# Altium PCB Boost_Converter.PcbDoc
Units mil, origin at the board's own origin, x right, y up, seen from the top; angles counter-clockwise.
Board outline 6000 x 4000 mil, 2 copper layers (Top Layer, Bottom Layer); 8 components, 5 nets, 21 pads, 6 vias.
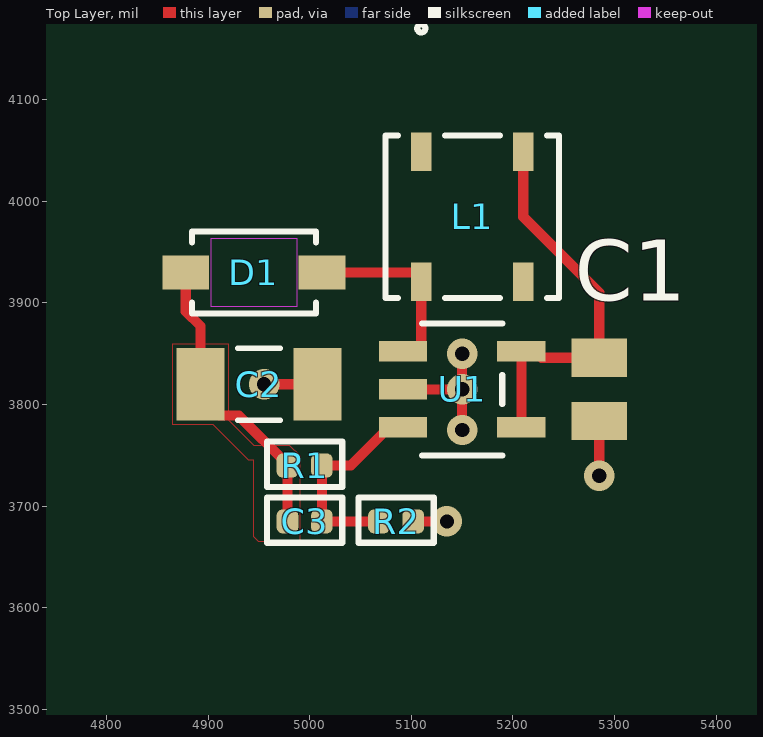
[diagram p0: Top Layer view]
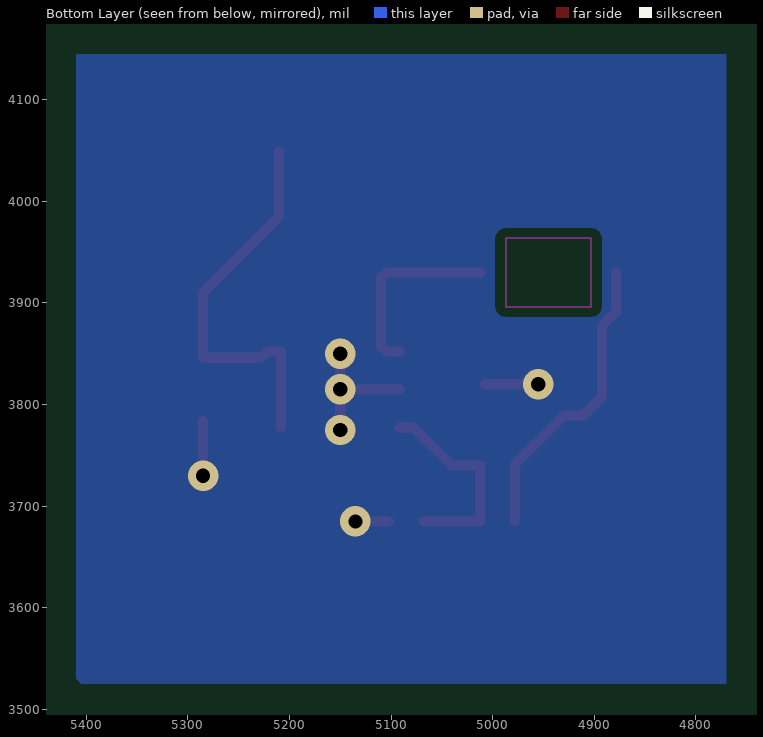
[diagram p1: Bottom Layer view, seen from below]
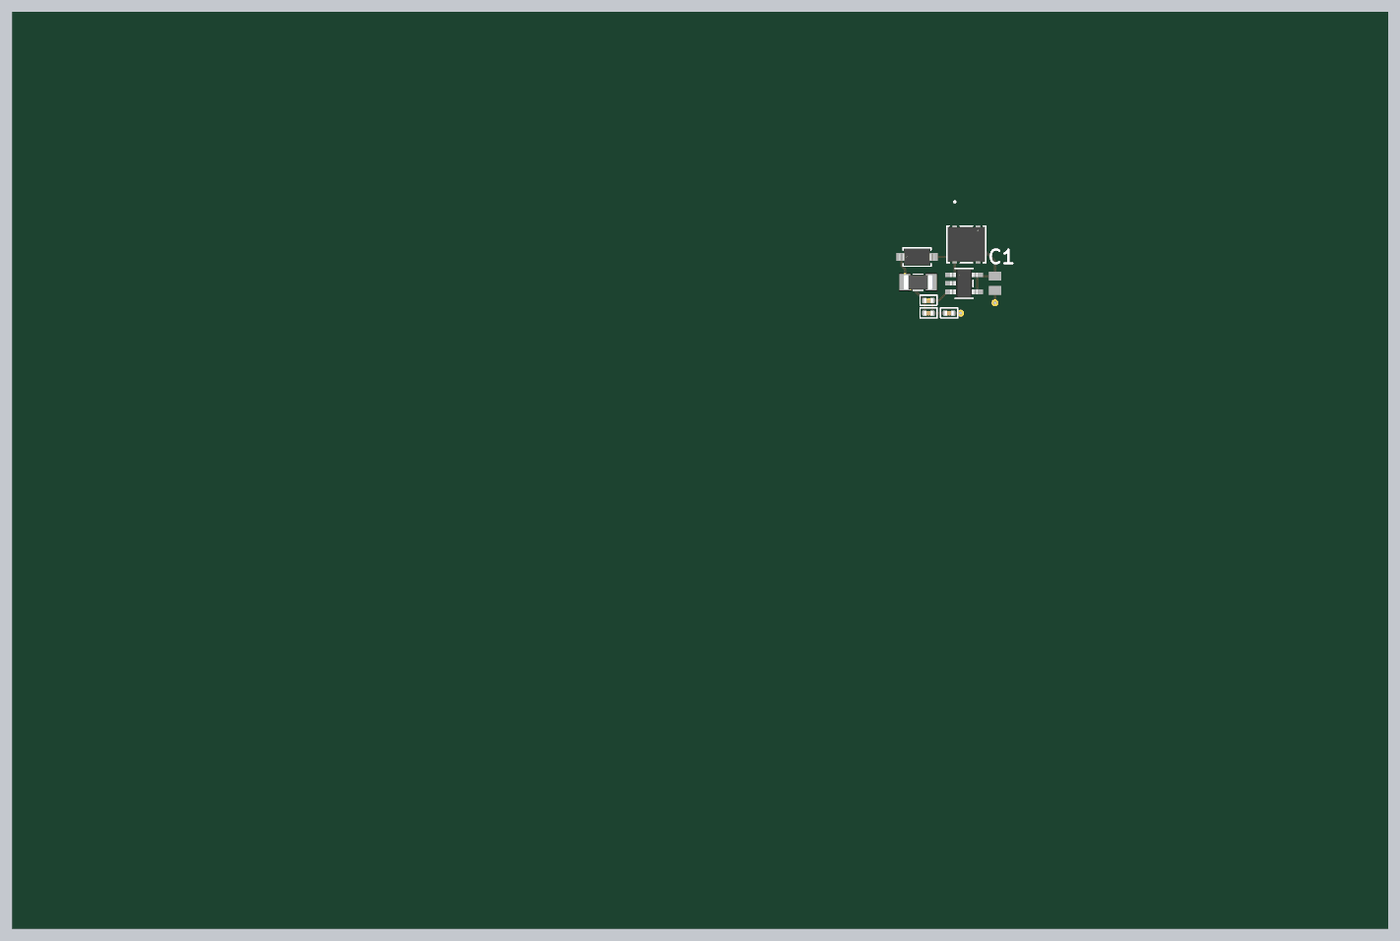
[diagram p2: 3D render of the assembled board from above, using the file's embedded part models]

## Layer stack, top to bottom
Top Solder: solder mask 0.4, Solder Resist, Dk 3.5
Top Layer: signal copper 1.4
Dielectric 1: dielectric 12.6, FR-4, Dk 4.8
Bottom Layer: signal copper 1.4
Bottom Solder: solder mask 0.4, Solder Resist, Dk 3.5

## Board outline
1000,1000 7000,1000 7000,5000 1000,5000

## Design rules (kind name [scope] priority, off if disabled: settings)
Clearance [All] p1: gap=10 ignorepadtopadclearanceinfootprint=FALSE
PolygonConnect [All] p1: connectstyle=Relief reliefconductorwidth=10 reliefentries=4 polygonreliefangle="90 Angle" airgapwidth=10
RoutingVias [All] p1: holewidth=28 width=50 viastyle="Through Hole" minholewidth=28 minwidth=50 maxholewidth=28 maxwidth=50
SolderMaskExpansion [All] p1: expansion=0 istentingtop=FALSE
SupplyNets "Schematic Supply Nets_2" [InNet('+5V')] p1: voltage=0.000
SupplyNets "Schematic Supply Nets_1" [InNet('+18V')] p2: voltage=0.000
SupplyNets "Schematic Supply Nets" [InNet('GND')] p3: voltage=0.000
Width [All] p1: maxlimit=10 minlimit=10 preferedwidth=10
30 further rules are at their usual default settings.

## Classes and differential pairs
component class Boost_Converter: C1 C2 C3 D1 R1 R2 U1

## Components (designator, comment, footprint, x,y, rotation, side; value= is the part's Value field where it differs from the comment)
C1 "JMK212BJ475MG-T" CAPC2012X135N 5285,3815 r270 top
C2 "GMK316BJ105KL-T" CAPC3216X180N 4950,3820 r0 top
C3 "22pF, 50V" CL05A105KL5NRNC 4995,3685 r180 top value=10µF
D1 "MBR0530-TP" SOD-123_MCC 4945,3930 r0 top
L1 "CR32NP-100KC" SMD4_CR32NP_SUM-L 5160,3985 r270 top
R1 "2.2M" CL05A105KL5NRNC 4995,3740 r180 top value=5.11kΩ
R2 "160K" CL05A105KL5NRNC 5085,3685 r180 top value=5.11kΩ
U1 "TPS61040DDCT" DDC5-M 5150,3815 r0 top

## Footprints (in the part's own frame and the unit in brackets; to place one, negate y for a bottom-side part, rotate by r counter-clockwise, add the part's x,y. Pads: shape width x height; smd on the part's side, far side on the other; paste and mask are expansions set on the pad)
CAPC2012X135N [mm] "6.3V 4.7uF X5R 20% 0805"
  rect 0.96x1.39 smd: 1(-0.79,0) 2(0.79,0)
CAPC3216X180N [mm]
  rect 1.2x1.82 smd paste+0 mask+0.102: 1(-1.46,0) 2(1.46,0)
  silkscreen extent -0.54,-0.9 0.54,0.9, body extent -1.6,-0.8 1.6,0.8, height 1.25
CL05A105KL5NRNC [mm]
  rrect53% 0.54x0.6 smd: 1(-0.43,0) 2(0.43,0)
  silkscreen extent -0.94,-0.6 0.94,0.53, body extent -0.5,-0.25 0.5,0.25, height 0.55
DDC5-M [mil]
  rect 47.5x20 smd paste+0 mask+0: 1(-58.25,37.4) 2(-58.25,0) 3(-58.25,-37.4) 4(58.25,-37.4) 5(58.25,37.4)
  silkscreen extent -40,-65 40,65, body extent -60,-60 60,60, height 43
SMD4_CR32NP_SUM-L [mm]
  rect 0.962x0.509 smd paste+0 mask+0: 1(-1.624,-1.275) 2(-1.624,1.275) 3(1.624,1.275) 4(1.624,-1.275)
  silkscreen extent -4.81,-2.17 2.03,2.17, body extent -1.91,-2.04 1.91,2.04, height 3
SOD-123_MCC [mil]
  rect 46x33 smd paste+0 mask+0: 1(-67,0) 2(67,0)
  Keep-Out Layer region: -42,-33.5 -42,33.5 42,33.5 42,-33.5
  silkscreen extent -61,-40 61,40, body extent -76,-36 76,36, height 53

## Part data
C1: "TAIYO YUDEN - JMK212BJ475MG-T - CERAMIC CAPACITOR 4.7UF, 6.3V, X5R, 20%, 0805", Manufacturer_Name="TAIYO YUDEN", Mouser Part Number=963-JMK212BJ475MG-T, Datasheet Link=http://www.mouser.com/datasheet/2/396/mlcc02_e-1307760.pdf, Geometry.Height=1.35mm, Manufacturer_Part_Number=JMK212BJ475MG-T, Mouser Price/Stock=https://www.mouser.co.uk/ProductDetail/Taiyo-Yuden/JMK212BJ475MG-T?qs=I6KAKw0tg2zktZTXqiY4IQ%3D%3D
C2: "Multilayer Ceramic Capacitor; 1206 35V X7R 1uF +-10% Paper T&R", Package="SMD-2 TAIYO", Check_prices=https://www.snapeda.com/parts/GMK316BJ105KL-T/Taiyo+Yuden/view-part/?ref=eda, MF="Taiyo Yuden", MP=GMK316BJ105KL-T, SnapEDA_Link=https://www.snapeda.com/parts/GMK316BJ105KL-T/Taiyo+Yuden/view-part/?ref=snap
C3: library part CC0402JRNPO9BN220, "CAP CER 22PF 50V C0G/NPO 0402", Case Code (Imperial)=0402, Case Code (Metric)=1005, Dielectric Material=Ceramic, LCSC Part NO=C307415, Manufacturer="Samsung Electro-Mechanics", Manufacturer Part Number=CL05A106MP8NUB8, Max Operating Temperature=85°C, Min Operating Temperature=-55°C, Tolerance=20%, Voltage Rating=10V, Case/Package=0402, Category="Ceramic Capacitors", China RoHS=Compliant, ComponentLink1Description=https://datasheet.octopart.com:443/CL05A106MP8NUB8-Samsung-Electro-Mechanics-datasheet-136460857.pdf?src-supplier=IHS, ComponentLink1URL=https://datasheet.octopart.com:443/CL05A106MP8NUB8-Samsung-Electro-Mechanics-datasheet-136460857.pdf?src-supplier=IHS, ComponentLink2Description=https://datasheet.octopart.com:443/CL05A106MP8NUB8-Samsung-Electro-Mechanics-datasheet-181551178.pdf?src-supplier=Newark, ComponentLink2URL=https://datasheet.octopart.com:443/CL05A106MP8NUB8-Samsung-Electro-Mechanics-datasheet-181551178.pdf?src-supplier=Newark, ComponentLink3Description=https://datasheet.octopart.com:443/CL05A106MP8NUB8-Samsung-Electro-Mechanics-datasheet-136031724.pdf?src-supplier=Newark, ComponentLink3URL=https://datasheet.octopart.com:443/CL05A106MP8NUB8-Samsung-Electro-Mechanics-datasheet-136031724.pdf?src-supplier=Newark, ComponentLink4Description=https://datasheet.octopart.com:443/CL05A106MP8NUB8-Samsung-Electro-Mechanics-datasheet-141346815.pdf?src-supplier=Samsung+SCT, ComponentLink4URL=https://datasheet.octopart.com:443/CL05A106MP8NUB8-Samsung-Electro-Mechanics-datasheet-141346815.pdf?src-supplier=Samsung+SCT, ComponentLink5Description=https://datasheet.octopart.com:443/CL05A106MP8NUB8-Samsung-Electro-Mechanics-datasheet-110326781.pdf?src-supplier=Future+Electronics, ComponentLink5URL=https://datasheet.octopart.com:443/CL05A106MP8NUB8-Samsung-Electro-Mechanics-datasheet-110326781.pdf?src-supplier=Future+Electronics, ComponentLink6Description=https://datasheet.octopart.com:443/CL05A106MP8NUB8-Samsung-Electro-Mechanics-datasheet-96443587.pdf?src-supplier=Future+Electronics, ComponentLink6URL=https://datasheet.octopart.com:443/CL05A106MP8NUB8-Samsung-Electro-Mechanics-datasheet-96443587.pdf?src-supplier=Future+Electronics, ComponentLink7Description=https://datasheet.octopart.com:443/CL05A106MP8NUB8-Samsung-Electro-Mechanics-datasheet-68297032.pdf?src-supplier=Future+Electronics, ComponentLink7URL=https://datasheet.octopart.com:443/CL05A106MP8NUB8-Samsung-Electro-Mechanics-datasheet-68297032.pdf?src-supplier=Future+Electronics, ComponentLink8Description=https://datasheet.octopart.com:443/CL05A106MP8NUB8-Samsung-Electro-Mechanics-datasheet-86032222.pdf?src-supplier=Future+Electronics, ComponentLink8URL=https://datasheet.octopart.com:443/CL05A106MP8NUB8-Samsung-Electro-Mechanics-datasheet-86032222.pdf?src-supplier=Future+Electronics, Country of Origin="Mainland China, Philippines, South Korea", Export Control Classification Number (ECCN) Code=EAR99, Harmonized Tariff Schedule (HTS) Code=8532.24.00.20, Height=800µm, Introduction Date=2014-02-27, Length=1mm, Lifecycle Status=Production, Material=Ceramic, Mounting Technology="Surface Mount", Number of Terminals=2, Pricing="10=0.219, 25=0.191, 50=0.163, 100=0.145, 250=0.131, 500=0.116, 1000=0.107 (USD)", REACH SVHC=Yes, RoHS=Compliant, Schedule B="8532240020, 8532240020|8532240020, 8532240020|8532240020|8532240020, 8532240020|8532240020|8532240020|8532240020", Stock=25769, Supplier=Newark, Supplier Part Number=CL05A106MP8NUB8, Thickness=889µm, Voltage Rating (DC)=10V, Width=500µm
D1: "DIODE SCHOTTKY 30V 500MA SOD123", Manufacturer_Name=MCC, Copyright="Copyright (C) 2025 Ultra Librarian. All rights reserved.", Manufacturer_Part_Number=MBR0530-TP
L1: "FIXED IND 10UH 760MA 230 MOHM", Manufacturer_Name=Sumida, Copyright="Copyright (C) 2025 Ultra Librarian. All rights reserved.", Manufacturer_Part_Number=CR32NP-100KC, RefDes=RefDes, Type="Fixed Inductors"
R1: library part RC0402FR-132M2L, "RES 2.2M OHM 1% 1/16W 0402", Case/Package=0402, LCSC Part number=C227153, Manufacturer="Yageo Group", Manufacturer Part Number=AC0402FR-075K11L, Max Operating Temperature=155°C, Max Power Dissipation=63mW, Min Operating Temperature=-55°C, Power Rating=62.5mW, Ratings=AEC-Q200, Temperature Coefficient=100ppm/°C, Tolerance=1%, Voltage Rating=50V, Category="Chip SMD Resistors", China RoHS=Non-Compliant, ComponentLink1Description=https://datasheet.octopart.com:443/AC0402FR-075K11L-Yageo-datasheet-182189377.pdf?src-supplier=IHS, ComponentLink1URL=https://datasheet.octopart.com:443/AC0402FR-075K11L-Yageo-datasheet-182189377.pdf?src-supplier=IHS, ComponentLink2Description=https://datasheet.octopart.com:443/AC0402FR-075K11L-Yageo-datasheet-83209224.pdf?src-supplier=Upverter, ComponentLink2URL=https://datasheet.octopart.com:443/AC0402FR-075K11L-Yageo-datasheet-83209224.pdf?src-supplier=Upverter, ComponentLink3Description=https://datasheet.octopart.com:443/AC0402FR-075K11L-Yageo-datasheet-178509465.pdf?src-supplier=Farnell, ComponentLink3URL=https://datasheet.octopart.com:443/AC0402FR-075K11L-Yageo-datasheet-178509465.pdf?src-supplier=Farnell, ComponentLink4Description=https://datasheet.octopart.com:443/AC0402FR-075K11L-Yageo-Group-datasheet-193561632.pdf?src-supplier=element14+APAC, ComponentLink4URL=https://datasheet.octopart.com:443/AC0402FR-075K11L-Yageo-Group-datasheet-193561632.pdf?src-supplier=element14+APAC, ComponentLink5Description=https://datasheet.octopart.com:443/AC0402FR-075K11L-Yageo-Group-datasheet-189830439.pdf?src-supplier=Future+Electronics, ComponentLink5URL=https://datasheet.octopart.com:443/AC0402FR-075K11L-Yageo-Group-datasheet-189830439.pdf?src-supplier=Future+Electronics, ComponentLink6Description=https://datasheet.octopart.com:443/AC0402FR-075K11L-Yageo-datasheet-166720450.pdf?src-supplier=Future+Electronics, ComponentLink6URL=https://datasheet.octopart.com:443/AC0402FR-075K11L-Yageo-datasheet-166720450.pdf?src-supplier=Future+Electronics, ComponentLink7Description=https://datasheet.octopart.com:443/AC0402FR-075K11L-Yageo-datasheet-151884373.pdf?src-supplier=Future+Electronics, ComponentLink7URL=https://datasheet.octopart.com:443/AC0402FR-075K11L-Yageo-datasheet-151884373.pdf?src-supplier=Future+Electronics, ComponentLink8Description=https://datasheet.octopart.com:443/AC0402FR-075K11L-Yageo-datasheet-137699919.pdf?src-supplier=Future+Electronics, ComponentLink8URL=https://datasheet.octopart.com:443/AC0402FR-075K11L-Yageo-datasheet-137699919.pdf?src-supplier=Future+Electronics, ComponentLink9Description=https://datasheet.octopart.com:443/AC0402FR-075K11L-Yageo-Group-datasheet-188689268.pdf?src-supplier=LCSC, ComponentLink9URL=https://datasheet.octopart.com:443/AC0402FR-075K11L-Yageo-Group-datasheet-188689268.pdf?src-supplier=LCSC, ComponentLink10Description=https://datasheet.octopart.com:443/AC0402FR-075K11L-Yageo-datasheet-128678413.pdf?src-supplier=X-ON, ComponentLink10URL=https://datasheet.octopart.com:443/AC0402FR-075K11L-Yageo-datasheet-128678413.pdf?src-supplier=X-ON, ComponentLink11Description=https://datasheet.octopart.com/AC0402FR-075K11L-Yageo-datasheet-12512238.pdf, ComponentLink11URL=https://datasheet.octopart.com/AC0402FR-075K11L-Yageo-datasheet-12512238.pdf, ComponentLink12Description=http://sigma.octopart.com:80/conflict_mineral_statement/Yageo-company-3.pdf?src-supplier=Compliance+Statements, ComponentLink12URL=http://sigma.octopart.com:80/conflict_mineral_statement/Yageo-company-3.pdf?src-supplier=Compliance+Statements, ComponentLink13Description=http://sigma.octopart.com:80/rohs_statement/Yageo-company-2.pdf?src-supplier=Compliance+Statements, ComponentLink13URL=http://sigma.octopart.com:80/rohs_statement/Yageo-company-2.pdf?src-supplier=Compliance+Statements, Composition="Thick Film", Country of Origin="Mainland China, Taiwan", Export Control Classification Number (ECCN) Code=EAR99, Features="Automotive AEC-Q200, Moisture Resistant", Harmonized Tariff Schedule (HTS) Code=8533.21.00.30, Height=320µm, Introduction Date=2012-04-10, Length=1mm, Lifecycle Status=Production, Mounting Technology="Surface Mount", Number of Terminals=2, Number of Terminations=2, Packaging="Tape & Reel", Pricing="10000=0.0017, 30000=0.0016 (USD)", REACH SVHC=Yes, RoHS=Compliant, Schedule B="8533210045, 8533210045|8533210045|8533210045|8533210045|8533210045", Stock=320000, Supplier="Arrow Electronics", Supplier Part Number=AC0402FR-075K11L, Width=500µm, Working Voltage=50V
R2: library part CPF0402B160KE1, "RES SMD 160K OHM 0.1% 1/16W 0402", Case/Package=0402, LCSC Part number=C227153, Manufacturer="Yageo Group", Manufacturer Part Number=AC0402FR-075K11L, Max Operating Temperature=155°C, Max Power Dissipation=63mW, Min Operating Temperature=-55°C, Power Rating=62.5mW, Ratings=AEC-Q200, Temperature Coefficient=100ppm/°C, Tolerance=1%, Voltage Rating=50V, Category="Chip SMD Resistors", China RoHS=Non-Compliant, ComponentLink1Description=https://datasheet.octopart.com:443/AC0402FR-075K11L-Yageo-datasheet-182189377.pdf?src-supplier=IHS, ComponentLink1URL=https://datasheet.octopart.com:443/AC0402FR-075K11L-Yageo-datasheet-182189377.pdf?src-supplier=IHS, ComponentLink2Description=https://datasheet.octopart.com:443/AC0402FR-075K11L-Yageo-datasheet-83209224.pdf?src-supplier=Upverter, ComponentLink2URL=https://datasheet.octopart.com:443/AC0402FR-075K11L-Yageo-datasheet-83209224.pdf?src-supplier=Upverter, ComponentLink3Description=https://datasheet.octopart.com:443/AC0402FR-075K11L-Yageo-datasheet-178509465.pdf?src-supplier=Farnell, ComponentLink3URL=https://datasheet.octopart.com:443/AC0402FR-075K11L-Yageo-datasheet-178509465.pdf?src-supplier=Farnell, ComponentLink4Description=https://datasheet.octopart.com:443/AC0402FR-075K11L-Yageo-Group-datasheet-193561632.pdf?src-supplier=element14+APAC, ComponentLink4URL=https://datasheet.octopart.com:443/AC0402FR-075K11L-Yageo-Group-datasheet-193561632.pdf?src-supplier=element14+APAC, ComponentLink5Description=https://datasheet.octopart.com:443/AC0402FR-075K11L-Yageo-Group-datasheet-189830439.pdf?src-supplier=Future+Electronics, ComponentLink5URL=https://datasheet.octopart.com:443/AC0402FR-075K11L-Yageo-Group-datasheet-189830439.pdf?src-supplier=Future+Electronics, ComponentLink6Description=https://datasheet.octopart.com:443/AC0402FR-075K11L-Yageo-datasheet-166720450.pdf?src-supplier=Future+Electronics, ComponentLink6URL=https://datasheet.octopart.com:443/AC0402FR-075K11L-Yageo-datasheet-166720450.pdf?src-supplier=Future+Electronics, ComponentLink7Description=https://datasheet.octopart.com:443/AC0402FR-075K11L-Yageo-datasheet-151884373.pdf?src-supplier=Future+Electronics, ComponentLink7URL=https://datasheet.octopart.com:443/AC0402FR-075K11L-Yageo-datasheet-151884373.pdf?src-supplier=Future+Electronics, ComponentLink8Description=https://datasheet.octopart.com:443/AC0402FR-075K11L-Yageo-datasheet-137699919.pdf?src-supplier=Future+Electronics, ComponentLink8URL=https://datasheet.octopart.com:443/AC0402FR-075K11L-Yageo-datasheet-137699919.pdf?src-supplier=Future+Electronics, ComponentLink9Description=https://datasheet.octopart.com:443/AC0402FR-075K11L-Yageo-Group-datasheet-188689268.pdf?src-supplier=LCSC, ComponentLink9URL=https://datasheet.octopart.com:443/AC0402FR-075K11L-Yageo-Group-datasheet-188689268.pdf?src-supplier=LCSC, ComponentLink10Description=https://datasheet.octopart.com:443/AC0402FR-075K11L-Yageo-datasheet-128678413.pdf?src-supplier=X-ON, ComponentLink10URL=https://datasheet.octopart.com:443/AC0402FR-075K11L-Yageo-datasheet-128678413.pdf?src-supplier=X-ON, ComponentLink11Description=https://datasheet.octopart.com/AC0402FR-075K11L-Yageo-datasheet-12512238.pdf, ComponentLink11URL=https://datasheet.octopart.com/AC0402FR-075K11L-Yageo-datasheet-12512238.pdf, ComponentLink12Description=http://sigma.octopart.com:80/conflict_mineral_statement/Yageo-company-3.pdf?src-supplier=Compliance+Statements, ComponentLink12URL=http://sigma.octopart.com:80/conflict_mineral_statement/Yageo-company-3.pdf?src-supplier=Compliance+Statements, ComponentLink13Description=http://sigma.octopart.com:80/rohs_statement/Yageo-company-2.pdf?src-supplier=Compliance+Statements, ComponentLink13URL=http://sigma.octopart.com:80/rohs_statement/Yageo-company-2.pdf?src-supplier=Compliance+Statements, Composition="Thick Film", Country of Origin="Mainland China, Taiwan", Export Control Classification Number (ECCN) Code=EAR99, Features="Automotive AEC-Q200, Moisture Resistant", Harmonized Tariff Schedule (HTS) Code=8533.21.00.30, Height=320µm, Introduction Date=2012-04-10, Length=1mm, Lifecycle Status=Production, Mounting Technology="Surface Mount", Number of Terminals=2, Number of Terminations=2, Packaging="Tape & Reel", Pricing="10000=0.0017, 30000=0.0016 (USD)", REACH SVHC=Yes, RoHS=Compliant, Schedule B="8533210045, 8533210045|8533210045|8533210045|8533210045|8533210045", Stock=320000, Supplier="Arrow Electronics", Supplier Part Number=AC0402FR-075K11L, Width=500µm, Working Voltage=50V
U1: "28-V, 400-mA Switch Boost Converter in SOT-23 for LCD and White LED Applications 5-SOT-23-THIN -40 to 125", Manufacturer_Name="Texas Instruments", Copyright="Copyright (C) 2026 Ultra Librarian. All rights reserved.", Manufacturer_Part_Number=TPS61040DDCT, RefDes=RefDes, Type=Type

## Via types
v1: diameter 30, hole 14, Top Layer to Bottom Layer, 6 vias

## Nets (pads, with @x,y where several pads share a name; then routed paths per layer and width w, separated by ;. In a path a pad name is that pad's centre, name@x,y a point inside that pad or via, vN(x,y) a via of type N, cw(c..) or ccw(c..) an arc to the next point about the centre after c; other vN are vias at no path point)
+5V: C1.1 L1.2 U1.4 U1.5 | length 388
  Top Layer w10: U1.4 U1.5 5222,3852.4 5228.3,3846.1 C1.1 5285,3910.1 5210.2,3984.9 L1.2
+18V: C2.1 C3.2 D1.1 R1.2 | length 297.5
  Top Layer w10: D1.1 4878,3891.92 4892.52,3877.4 C2.1 4892.52,3807.8 4911.14,3789.17 4930.08,3789.17 4978.07,3741.18 R1.2 C3.2
GND: C1.2 C2.2 R2.1 U1.2 | length 278.1
  Top Layer w10: v1(4955,3820) C2.2 ; U1.2 v1(5150,3815) ; R2.1 v1(5135,3685) v1@5135,3690.41 ; v1(5150,3775) v1(5150,3815) ; v1(5150,3850) v1(5150,3815) ; v1(5285,3730) C1.2
NetC3_1: C3.1 R1.1 R2.2 U1.3 | length 206.5
  Top Layer w10: R2.2 C3.1 R1.1 5040.4,3740 5078,3777.6 U1.3
NetD1_2: D1.2 L1.4 U1.1 | length 187.6
  Top Layer w10: D1.2 5104.79,3930 5109.8,3924.98 L1.4 5109.8,3857.4 5104.8,3852.4 U1.1
pads on no net: L1.1 L1.3

## Polygon pours and split planes (outlines as drawn)
GND on Bottom Layer "GND_L02_P000" (solid, pour order 0): 4760,4155 4770,4145 5410,4145 5410,3530 5405,3525 4770,3525 4770,4150 4765,4155
+18V on Top Layer "+18V_L01_P002" (solid, pour order 2): 4865,3860 4920,3860 4920,3785 4945,3760 4980,3760 4990,3750 4990,3665 4950,3665 4945,3670 4945,3745 4940,3745 4905,3780 4865,3780

## Text inside footprints (layer, text, board x,y; h text height)
D1: Mechanical 13 "*" at 4886.5,3905 h50
U1: Mechanical 13 "*" at 5113,3829.4 h50